# Altium PCB DC-DC_BUCK-BOOST.PcbDoc (part 3 of 3)
Units mm, origin at the board's own origin, x right, y up, seen from the top; angles counter-clockwise.
Board outline 250 x 400 mm, 4 copper layers (Top Layer 1, Top Layer, Bottom Layer, Bottom Layer 1), stack 0.603 mm thick; 332 components, 145 nets, 884 pads, 70 vias.
Unrouted connection lines stored in the file: 20.
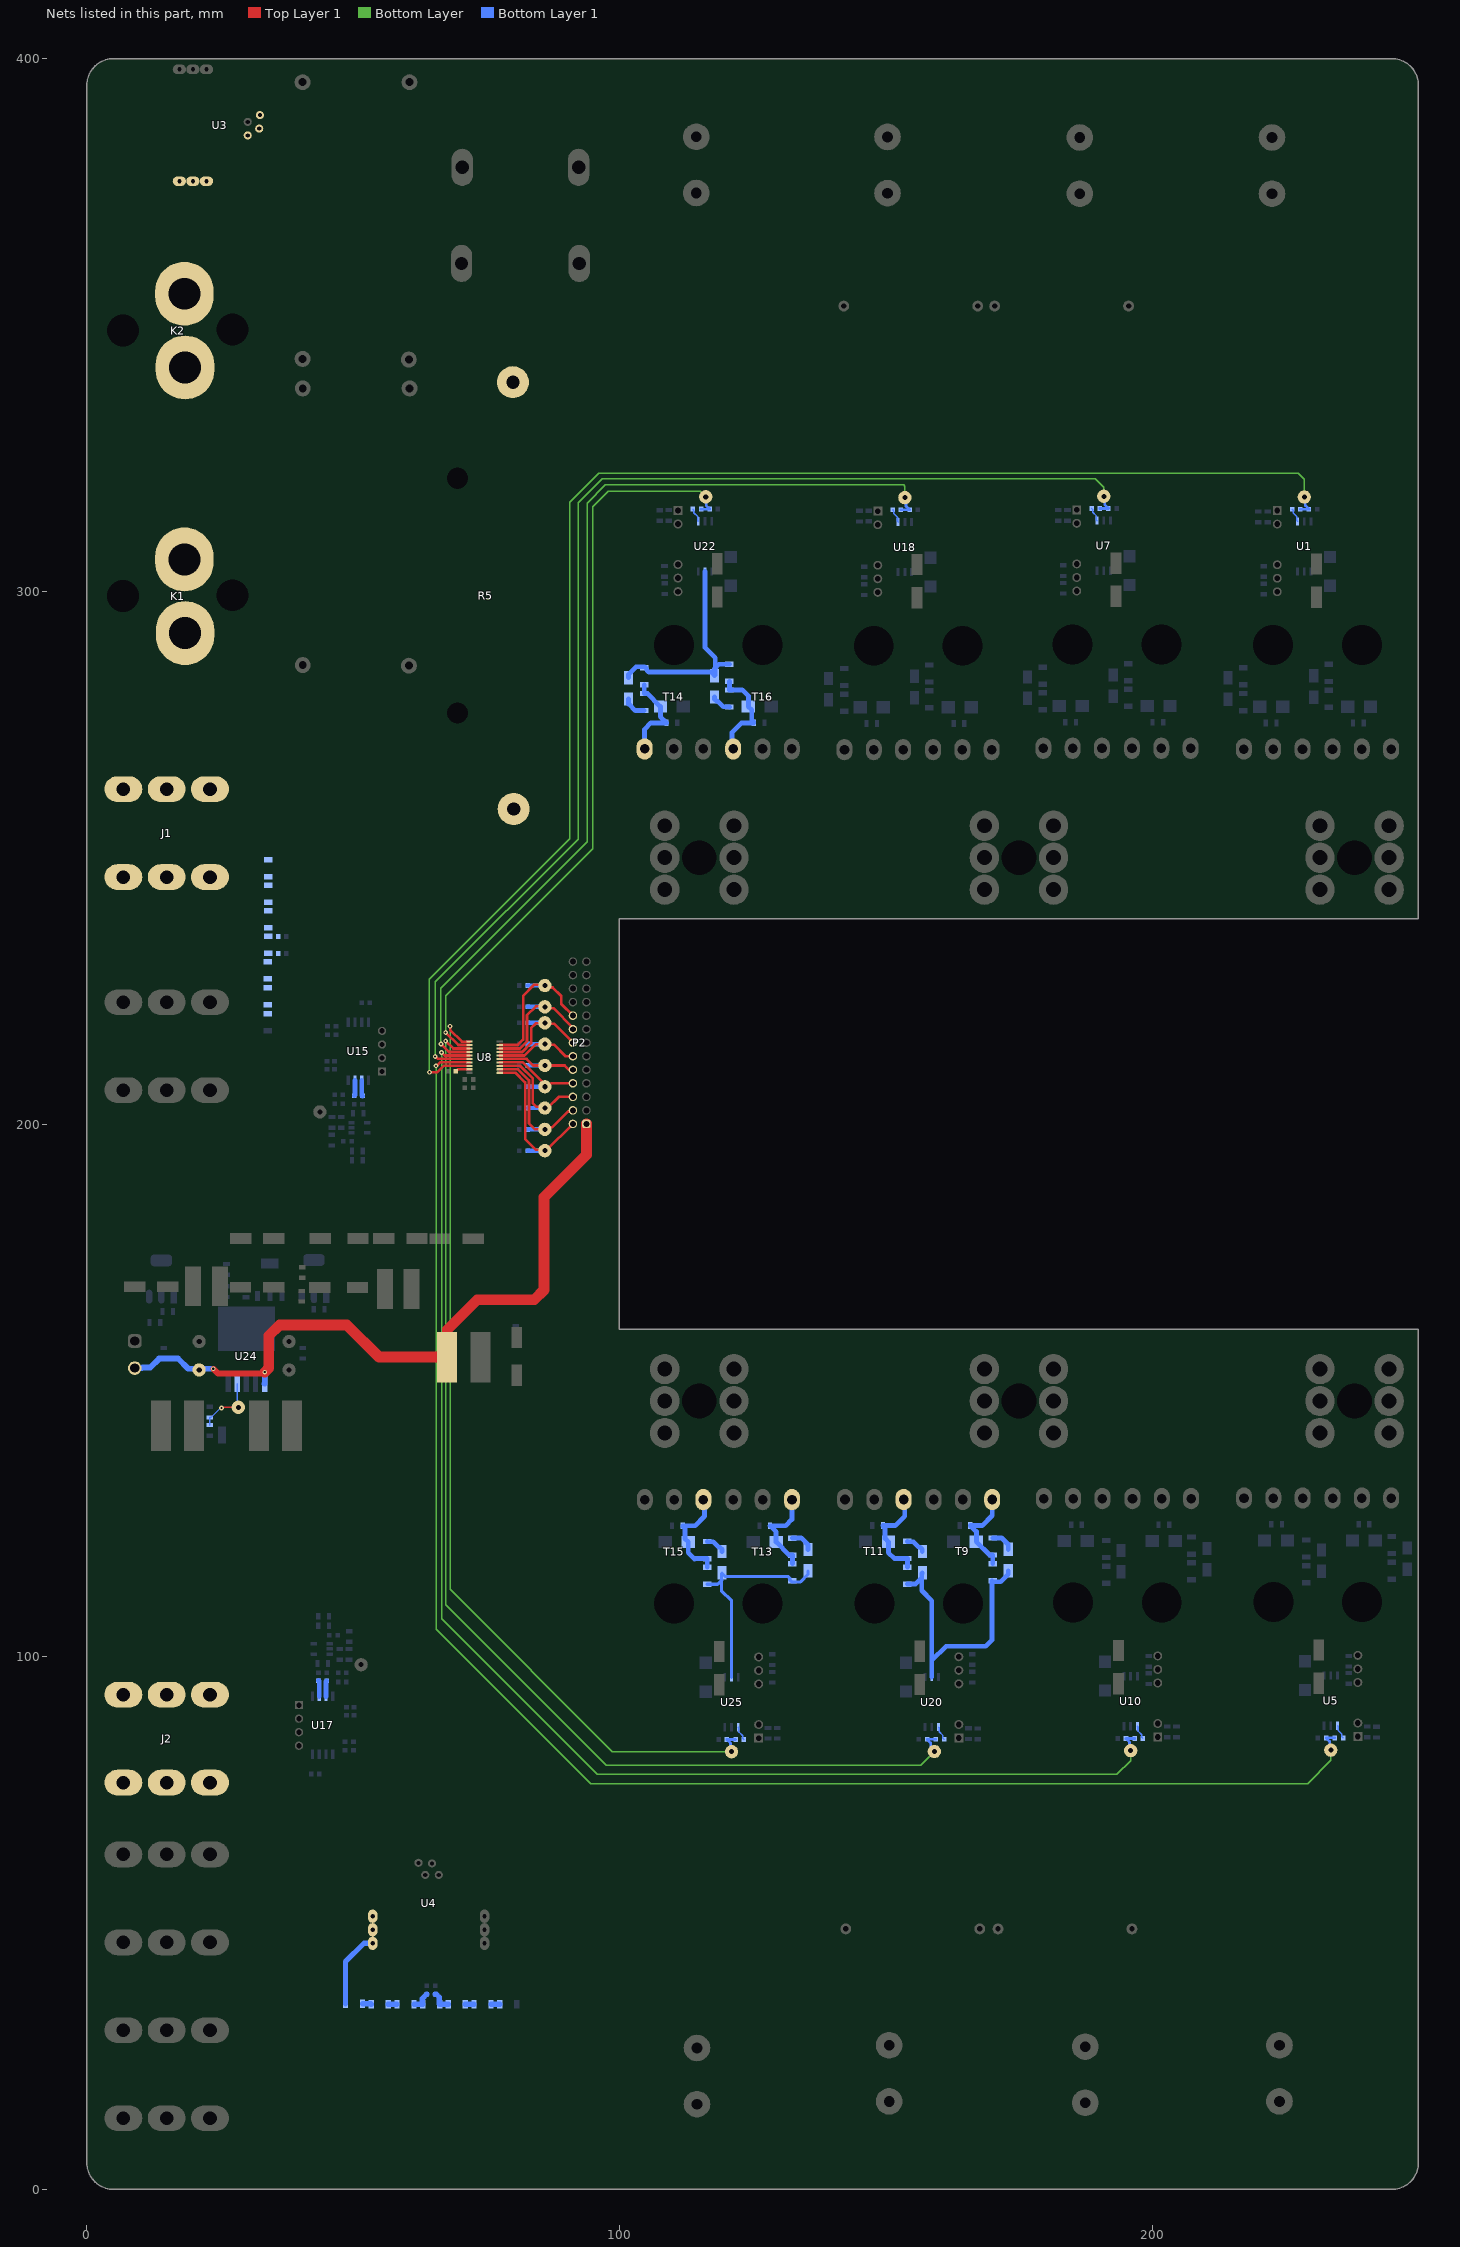
[diagram p4: the nets of this part, all layers, seen from the top]

## Via types
v1: diameter 0.9, hole 0.4, Top Layer 1 to Bottom Layer 1, tented both sides, 41 vias
v2: diameter 1.27, hole 0.711, Top Layer 1 to Bottom Layer 1, 21 vias
v3: diameter 0.7, hole 0.3, Top Layer 1 to Bottom Layer 1, 4 vias
v4: diameter 0.9, hole 0.4, Top Layer 1 to Bottom Layer 1, 2 vias
v5: diameter 0.8, hole 0.3, Top Layer 1 to Bottom Layer 1, 2 vias

## Nets (pads, with @x,y where several pads share a name; then routed paths per layer and width w, separated by ;. In a path a pad name is that pad's centre, name@x,y a point inside that pad or via, vN(x,y) a via of type N, cw(c..) or ccw(c..) an arc to the next point about the centre after c; other vN are vias at no path point) (continued)
NetD22_1: D22.1 D24.1 R86.2 R90.2 U20.5 | length 51.4
  Bottom Layer 1 w0.9: R86.2@154.066,113.622 155.556,113.622 156.733,114.799 D22.1@156.733,115.635 ; 156.733,114.398 156.733,112.428 158.638,110.523 158.638,99.303 ; D22.1@156.86,115.645 D22.1@156.86,115.762 ; U20.5@158.638,96.172 158.638,99.303 ; R90.2@169.953,114.079 171.592,114.079 172.989,115.476 D24.1@172.989,116.143 ; R90.2@169.953,114.219 169.953,103.153 168.775,101.975 161.31,101.975 158.638,99.303
NetD22_2: D22.2 R85.2 | length 3.8
  Bottom Layer 1 w0.9: R85.2@154.066,121.648 154.116,121.598 155.183,121.598 156.219,120.562 156.46,120.562 156.86,120.162 D22.2@156.86,119.762
NetD23_2: D23.2 R85.1 R86.1 R87.1 T11.1 | length 19.2
  Bottom Layer 1 w0.9: T11.1@153.343,129.515 153.558,129.3 153.558,126.398 151.78,124.62 149.875,124.62 R87.1@149.478,124.62 149.528,124.57 149.528,124.445 149.875,124.098 149.875,122.198 D23.2@150.501,121.572 150.501,119.549 151.653,118.397 151.704,118.448 R85.1@154.066,118.448 R86.1@154.066,116.822
NetD24_2: D24.2 R88.2 | length 4.4
  Bottom Layer 1 w0.9: R88.2@170.063,122.295 171.68,122.295 171.719,122.334 172.989,121.064 D24.2@172.989,120.143
NetD25_2: D25.2 R88.1 R90.1 R91.1 T9.1 | length 17.1
  Bottom Layer 1 w0.9: T9.1@169.98,129.515 169.98,126.505 168.095,124.62 R91.1@165.861,124.62 167.002,123.479 D25.2@167.002,121.572 169.479,119.095 R88.1@170.063,119.095 R90.1@170.063,117.469
NetD26_1: D26.1 D28.1 R93.2 R97.2 U22.5 | length 41.7
  Bottom Layer 1 w0.9: D28.1@101.712,283.792 101.712,284.459 103.109,285.856 104.748,285.856 105.138,285.466 105.138,285.191 105.49,284.84 117.291,284.84 117.841,284.29 D26.1@117.841,284.173 ; U22.5@116.063,303.763 116.063,289.412 117.968,287.507 117.968,285.475 D26.1@117.968,284.3 ; 117.841,285.475 118.679,286.313 R93.2@120.635,286.313
NetD26_2: D26.2 R92.2 | length 3.8
  Bottom Layer 1 w0.9: D26.2@117.841,280.173 117.841,279.773 118.241,279.373 118.482,279.373 119.518,278.337 120.585,278.337 R92.2@120.635,278.287
NetD27_2: D27.2 R92.1 R93.1 R94.1 T16.1 | length 19.2
  Bottom Layer 1 w0.9: R93.1@120.635,283.113 R92.1@120.635,281.487 122.997,281.487 123.048,281.538 124.2,280.386 D27.2@124.2,278.363 124.826,277.737 124.826,275.837 125.173,275.49 125.173,275.365 R94.1@125.223,275.315 124.826,275.315 122.921,275.315 121.143,273.537 121.143,270.635 T16.1@121.358,270.42
NetD28_2: D28.2 R95.2 | length 4.4
  Bottom Layer 1 w0.9: D28.2@101.712,279.792 101.712,278.871 102.982,277.601 103.021,277.64 R95.2@104.638,277.64
NetD29_2: D29.2 R95.1 R97.1 R98.1 T14.1 | length 17.6
  Bottom Layer 1 w0.9: R97.1@104.638,282.466 R95.1@104.638,280.84 105.222,280.84 D29.2@107.699,278.363 107.699,276.456 R98.1@108.84,275.315 105.903,275.315 104.721,274.133 104.721,270.674 T14.1@104.721,270.42
NetD30_1: D30.1 D32.1 R100.2 R104.2 U25.5 | length 41.7
  Bottom Layer 1 w0.6: R100.2@116.474,113.593 118.43,113.593 119.268,114.431 ; D30.1@119.141,115.606 119.141,114.431 119.141,112.399 121.046,110.494 U25.5@121.046,96.143 ; D30.1@119.268,115.733 119.268,115.616 119.818,115.066 131.619,115.066 131.971,114.715 131.971,114.44 132.361,114.05 134,114.05 135.397,115.447 D32.1@135.397,116.114
NetD30_2: D30.2 R99.2 | length 3.8
  Bottom Layer 1 w0.9: R99.2@116.474,121.619 116.524,121.569 117.591,121.569 118.627,120.533 118.868,120.533 119.268,120.133 D30.2@119.268,119.733
NetD31_2: D31.2 R99.1 R100.1 R101.1 T15.1 | length 19.2
  Bottom Layer 1 w0.9: T15.1@115.751,129.486 115.966,129.271 115.966,126.369 114.188,124.591 112.283,124.591 R101.1@111.886,124.591 111.936,124.541 111.936,124.416 112.283,124.069 112.283,122.169 D31.2@112.909,121.543 112.909,119.52 114.061,118.368 114.112,118.419 R99.1@116.474,118.419 R100.1@116.474,116.793
NetD32_2: D32.2 R102.2 | length 4.4
  Bottom Layer 1 w0.9: R102.2@132.471,122.266 134.088,122.266 134.127,122.305 135.397,121.035 D32.2@135.397,120.114
NetD33_2: D33.2 R102.1 R104.1 R105.1 T13.1 | length 17.6
  Bottom Layer 1 w0.9: T13.1@132.388,129.486 132.388,129.232 132.388,125.773 131.206,124.591 R105.1@128.269,124.591 129.41,123.45 D33.2@129.41,121.543 131.887,119.066 R102.1@132.471,119.066 R104.1@132.471,117.44
NetJ1_1: J1.1 K1.2 R5.1 R32.2
NetJ2_1: J2.1 R33.2 U4.5 U4.6 U4.7 | length 14.5
  Bottom Layer 1 w1: R33.2@48.575,34.825 48.575,42.745 52.04,46.21 53.66,46.21 U4.7@53.675,46.195
NetK1_1: K1.1 K2.2 R5.2
NetK2_1: K2.1 U3.8 U3.9 U3.10
NetP2_2: P2.2 R23.2 TP2.1 U8.1 | length 31.3
  Top Layer 1 w0.5: U8.1@77.55,209.625 80.5,209.625 82.3,207.825 82.3,197.175 84.323,195.152 86.083,195.152 86.235,195 P2.2@91.26,200.025
  Bottom Layer 1 w0.8: R23.2@82.775,195 TP2.1@86,195
NetP2_4: P2.4 R31.2 TP10.1 U8.2 | length 27.8
  Top Layer 1 w0.5: U8.2@77.55,210.275 80.95,210.275 83.025,208.2 83.025,200.125 84.15,199 TP10.1@86,199 86.383,199.383 87.358,199.383 90.33,202.355 91.05,202.355 P2.4@91.26,202.565
  Bottom Layer 1 w0.8: R31.2@82.775,199 TP10.1@86,199
NetP2_6: P2.6 R30.2 TP9.1 U8.3 | length 23.8
  Top Layer 1 w0.5: U8.3@77.55,210.925 81.375,210.925 83.75,208.55 83.75,203.875 84.398,203.227 85.773,203.227 TP9.1@86,203 86.5,203 88.605,205.105 P2.6@91.26,205.105
  Bottom Layer 1 w0.8: R30.2@82.775,203 TP9.1@86,203
NetP2_8: P2.8 R29.2 TP8.1 U8.4 | length 19.3
  Top Layer 1 w0.5: U8.4@77.55,211.575 81.85,211.575 86,207.425 TP8.1@86,207 86.541,207 87.186,207.645 P2.8@91.26,207.645
  Bottom Layer 1 w0.8: R29.2@82.775,207 TP8.1@86,207
NetP2_10: P2.10 R28.2 TP7.1 U8.5 | length 17.8
  Top Layer 1 w0.5: U8.5@77.55,212.225 82.55,212.225 83.775,211 TP7.1@86,211 89.7,211 90.515,210.185 P2.10@91.26,210.185
  Bottom Layer 1 w0.8: R28.2@82.775,211 TP7.1@86,211
NetP2_12: P2.12 R27.2 TP6.1 U8.6 | length 18.8
  Top Layer 1 w0.5: U8.6@77.55,212.875 82.175,212.875 84.293,214.993 85.993,214.993 TP6.1@86,215 86.108,214.892 87.707,214.892 89.875,212.725 P2.12@91.26,212.725
  Bottom Layer 1 w0.8: R27.2@82.775,215 TP6.1@86,215
NetP2_14: P2.14 R26.2 TP5.1 U8.7 | length 22.4
  Top Layer 1 w0.5: U8.7@77.55,213.525 81.75,213.525 83.425,215.2 83.425,218.05 84.293,218.918 85.918,218.918 TP5.1@86,219 86.152,218.848 87.677,218.848 P2.14@91.26,215.265
  Bottom Layer 1 w0.8: R26.2@82.775,219 TP5.1@86,219
NetP2_16: P2.16 R25.2 TP4.1 U8.8 | length 25
  Top Layer 1 w0.5: U8.8@77.55,214.175 81.3,214.175 82.65,215.525 82.65,220.45 84.293,222.093 85.907,222.093 86.252,221.748 87.577,221.748 91.26,218.065 P2.16@91.26,217.805
  Bottom Layer 1 w0.8: R25.2@82.775,222 TP4.1@86,222
NetP2_18: P2.18 R24.2 TP3.1 U8.9 | length 29.7
  Top Layer 1 w0.5: U8.9@77.55,214.825 80.9,214.825 81.925,215.85 81.925,224.075 84,226.15 85.85,226.15 86.364,225.636 87.464,225.636 89.075,224.025 89.075,222.53 P2.18@91.26,220.345
  Bottom Layer 1 w0.8: R24.2@82.775,226 TP3.1@86,226
NetR2_1: R2.1 R21.2 TP18.1 U8.18 | length 274.2
  Top Layer 1 w0.5: v1(64.325,209.725) 65.8,209.725 67,210.925 U8.18@71.85,210.925
  Bottom Layer w0.254: v1(64.325,209.725) 64.3,209.75 64.3,227.175 90.7,253.575 90.7,316.75 96.15,322.2 227.45,322.2 228.569,321.081 TP18.1@228.569,317.709
  Bottom Layer 1 w0.5: R2.1@227.82,315.423 R21.2@229.445,315.423 229.445,315.448 229.27,315.623 229.245,315.623 228.778,316.09 228.778,317.5 TP18.1@228.569,317.709
NetR2_2: R2.2 U1.1 | length 2.7
  Bottom Layer 1 w0.3: R2.2@226.27,315.423 226.478,315.215 226.478,314.72 227.182,314.016 227.182,313.254 U1.1@227.299,313.137
NetR10_1: R10.1 R20.2 TP17.1 U8.17 | length 300.3
  Top Layer 1 w0.5: v1(65.575,210.925) 65.683,210.925 66.333,211.575 U8.17@71.85,211.575
  Bottom Layer w0.254: v1(65.575,210.925) 65.575,105.175 94.575,76.175 229.2,76.175 233.543,80.518 TP17.1@233.543,82.467
  Bottom Layer 1 w0.5: TP17.1@233.543,82.467 233.334,82.676 233.334,84.086 232.867,84.553 232.842,84.553 232.667,84.728 R20.2@232.667,84.753 R10.1@234.292,84.753
NetR10_2: R10.2 U5.1 | length 2.7
  Bottom Layer 1 w0.3: U5.1@234.813,87.039 234.93,86.922 234.93,86.16 235.634,85.456 235.634,84.961 R10.2@235.842,84.753
NetR14_2: R14.2 R103.1 TP11.1 U8.11 | length 180.7
  Top Layer 1 w0.5: v1(68.2,218.35) 68.224,218.326 68.224,217.676 70.425,215.475 U8.11@71.85,215.475
  Bottom Layer w0.254: v1(68.2,218.35) 68.2,112.65 98.677,82.173 TP11.1@121.046,82.173
  Bottom Layer 1 w0.5: TP11.1@121.046,82.173 120.837,82.382 120.837,83.792 120.37,84.259 120.345,84.259 120.17,84.434 R14.2@120.17,84.459 R103.1@121.795,84.459
NetR15_2: R15.2 R96.1 TP12.1 U8.12 | length 142.7
  Top Layer 1 w0.5: v1(67.375,217.2) 69.75,214.825 U8.12@71.85,214.825
  Bottom Layer w0.254: v1(67.375,217.2) 67.375,224.05 94.975,251.65 94.975,315.925 97.85,318.8 115.154,318.8 115.77,318.184 115.77,318.18 TP12.1@116.2,317.75
  Bottom Layer 1 w0.5: R96.1@115.314,315.447 116.739,315.447 R15.2@116.939,315.447 116.939,315.472 116.764,315.647 116.739,315.647 116.272,316.114 116.272,317.678 TP12.1@116.2,317.75
NetR16_2: R16.2 R89.1 TP13.1 U8.13 | length 220.5
  Top Layer 1 w0.5: v1(67.375,215.6) 68.8,214.175 U8.13@71.85,214.175
  Bottom Layer w0.254: v1(67.375,215.6) 67.375,109.75 97.5,79.625 156.536,79.625 TP13.1@159.113,82.202
  Bottom Layer 1 w0.5: TP13.1@158.638,82.202 158.429,82.411 158.429,83.821 157.962,84.288 157.937,84.288 157.762,84.463 R16.2@157.762,84.488 R89.1@159.387,84.488
NetR17_2: R17.2 R79.1 TP14.1 U8.14 | length 186.5
  Top Layer 1 w0.5: v1(66.5,215) 67.975,213.525 U8.14@71.85,213.525
  Bottom Layer w0.254: v1(66.5,215) 66.45,215.05 66.45,225.475 93.925,252.95 93.925,316.575 97.325,319.975 153.325,319.975 153.584,319.716 TP14.1@153.584,317.599
  Bottom Layer 1 w0.5: R79.1@152.835,315.313 R17.2@154.46,315.313 154.46,315.338 154.285,315.513 154.26,315.513 153.793,315.98 153.793,317.39 TP14.1@153.584,317.599
NetR18_2: R18.2 R70.1 TP15.1 U8.15 | length 260.6
  Top Layer 1 w0.5: v1(66.6,213.45) 67.175,212.875 U8.15@71.85,212.875
  Bottom Layer w0.254: v1(66.6,213.45) 66.6,107.1 95.8,77.9 193.4,77.9 195.969,80.469 TP15.1@195.969,82.367
  Bottom Layer 1 w0.5: TP15.1@195.969,82.367 195.76,82.576 195.76,83.986 195.293,84.453 195.268,84.453 195.093,84.628 R18.2@195.093,84.653 R70.1@196.718,84.653
NetR19_2: R19.2 R39.1 TP16.1 U8.16 | length 228.9
  Top Layer 1 w0.5: v1(65.4,212.675) 65.508,212.675 65.958,212.225 U8.16@71.85,212.225
  Bottom Layer w0.254: v1(65.4,212.675) 65.4,226.675 92.225,253.5 92.225,316.625 96.775,321.175 189.3,321.175 190.927,319.548 TP16.1@190.927,317.851
  Bottom Layer 1 w0.5: R39.1@190.178,315.565 R19.2@191.803,315.565 191.803,315.59 191.628,315.765 191.603,315.765 191.136,316.232 191.136,317.642 TP16.1@190.927,317.851
NetR22_2: R22.2 U8.19 | length 2.7
  Top Layer 1 w0.5: R22.2@69.275,209.925 69.287,209.913 69.65,210.275 U8.19@71.85,210.275
NetR32_1: R32.1 R37.2
NetR33_1: R33.1 R38.2 | length 1.6
  Bottom Layer 1 w1: R33.1@51.775,34.825 53.35,34.825 R38.2@53.4,34.775
NetR37_1: R37.1 R40.2
NetR38_1: R38.1 R41.2 | length 1.6
  Bottom Layer 1 w1: R38.1@56.6,34.775 58.175,34.775 R41.2@58.225,34.725
NetR39_2: R39.2 U7.1 | length 2.7
  Bottom Layer 1 w0.3: R39.2@188.628,315.565 188.836,315.357 188.836,314.862 189.54,314.158 189.54,313.396 U7.1@189.657,313.279
NetR40_1: R40.1 R46.2 R48.2
NetR41_1: R41.1 R47.2 R49.2 | length 3.9
  Bottom Layer 1 w1: R41.1@61.425,34.725 R49.2@63.05,34.725 63,34.775 63,35.825 R47.2@63.825,36.65
NetR42_2: R42.2 U15.7 | length 3
  Bottom Layer 1 w0.9: R42.2@50.21,205.301 50.34,205.431 U15.7@50.34,208.225
NetR43_2: R43.2 U17.7 | length 3
  Bottom Layer 1 w0.9: U17.7@44.92,92.551 44.92,95.345 R43.2@45.05,95.475
NetR48_1: R48.1 R54.2 R56.2
NetR49_1: R49.1 R55.2 R57.2 | length 4
  Bottom Layer 1 w1: R55.2@65.4,36.65 65.425,36.625 65.625,36.625 66.175,36.075 66.175,34.8 R49.1@66.25,34.725 R57.2@67.85,34.725
NetR50_2: R50.2 U15.6 | length 3.2
  Bottom Layer 1 w0.9: U15.6@51.61,208.225 51.61,205.326 51.735,205.201 51.735,205.251 R50.2@51.785,205.301
NetR51_2: R51.2 U17.6 | length 3.2
  Bottom Layer 1 w0.9: R51.2@43.475,95.475 43.525,95.525 43.525,95.575 43.65,95.45 U17.6@43.65,92.551
NetR56_1: R56.1 R60.2
NetR57_1: R57.1 R61.2 | length 1.7
  Bottom Layer 1 w1: R57.1@71.05,34.725 72.675,34.725 R61.2@72.7,34.75
NetR60_1: R60.1 R62.2
NetR61_1: R61.1 R63.2 | length 1.6
  Bottom Layer 1 w1: R61.1@75.9,34.75 R63.2@77.525,34.75
NetR70_2: R70.2 U10.1 | length 2.7
  Bottom Layer 1 w0.3: U10.1@197.239,86.939 197.356,86.822 197.356,86.06 198.06,85.356 198.06,84.861 R70.2@198.268,84.653
NetR76_1: R76.1 R77.2 TP21.1 U24.4 | length 12.1
  Top Layer 1 w0.3: v1(25.273,146.689) 25.4,146.816 TP21.1@28.448,146.816
  Bottom Layer 1 w0.3: R77.2@23.114,143.498 R76.1@23.114,144.927 23.339,144.927 25.101,146.689 v1(25.273,146.689) ; U24.4@28.27,151.253 28.27,146.994 TP21.1@28.448,146.816
NetR79_2: R79.2 U18.1 | length 2.7
  Bottom Layer 1 w0.3: R79.2@151.285,315.313 151.493,315.105 151.493,314.61 152.197,313.906 152.197,313.144 U18.1@152.314,313.027
NetR89_2: R89.2 U20.1 | length 2.7
  Bottom Layer 1 w0.3: U20.1@159.908,86.774 160.025,86.657 160.025,85.895 160.729,85.191 160.729,84.696 R89.2@160.937,84.488
NetR96_2: R96.2 U22.1 | length 2.7
  Bottom Layer 1 w0.3: R96.2@113.764,315.447 113.972,315.239 113.972,314.744 114.676,314.04 114.676,313.278 U22.1@114.793,313.161
NetR103_2: R103.2 U25.1 | length 2.7
  Bottom Layer 1 w0.3: U25.1@122.316,86.745 122.433,86.628 122.433,85.866 123.137,85.162 123.137,84.667 R103.2@123.345,84.459
NetU3_1: U3.1
NetU3_2: U3.2
NetU3_4: U3.4
VCC: C74.1 C77.2 L1.1 P1.2 P2.1 U24.1 | length 132
  Top Layer 1 w1.1: v1(23.749,154.055) 24.604,153.2 33.181,153.2 v1(33.401,153.42)
  Top Layer 1 w2: v1(33.401,153.42) 34.175,154.194 34.175,160.25 36.2,162.275 48.825,162.275 54.85,156.25 L1.1@67.65,156.25 67.65,161.4 73.275,167.025 84,167.025 85.825,168.85 85.825,186.25 93.8,194.225 P2.1@93.8,200.025
  Bottom Layer 1 w1.1: 10.375,154.182 10.488,154.295 11.924,154.295 13.579,155.95 14.451,155.95 C77.2@14.478,155.976 17.129,155.976 19.05,154.055 v1(23.749,154.055) ; U24.1@33.376,151.253 33.401,151.278 v1(33.401,153.42)
pads on no net: J6.0 J7.0 J8.0 J9.0 J11.0 J12.0 K1.0 K2.0 P2.3 P2.5 P2.7 P2.9 P2.11 P2.21 P2.22 P2.23 P2.24 P2.25 P2.26 R5.0 T1.0 T2.0 T3.0 T4.0 T5.0 T6.0 T7.0 T8.0 T9.0 T10.0 T11.0 T12.0 T13.0 T14.0 T15.0 T16.0 U1.2 U4.1 U4.2 U4.3 U4.4 U5.2 U7.2 U10.2 U18.2 U20.2 U22.2 U25.2

## Polygon pours and split planes (outlines as drawn)
NetC92_1 on Top Layer 1 "NETC92_1_L01_P045" (solid, pour order 45): 37.525,281.5 37.525,293.85 37.55,293.875 37.525,293.9 37.525,363.675 41.625,367.775 73.5,367.775 78.675,362.6 78.675,351.1 64.6,337.025 64.6,280.85 64.625,280.825
NetC92_1 on Top Layer 1 "NETC92_1_L01_P044" (solid, pour order 44): 5.1,200.95 0.675,205.375 0.375,205.375 0.375,227.075 4.225,230.925 28.3,230.925 41.6,244.225 41.6,271.05 37.525,275.125 37.525,291.275 40.25,294 61.225,294 64.625,290.6 64.625,280.825 53.6,269.8 53.6,235.925 29.675,212 29.675,204.925 25.75,201 23.95,201 5.2,201
NetJ1_1 on Top Layer 1 "NETJ1_1_L01_P042" (solid, pour order 42): 4.464,242.686 1.4,245.75 1.4,263.975 5.425,268 8.45,268 11.5,271.05 11.5,294.975 14.775,298.25 21.75,298.25 24.5,295.5 24.5,269.325 25.9,267.925 27.075,267.925 29.75,265.25 29.75,246.75 25.664,242.664
NetK1_1 on Top Layer 1 "NETK1_1_L01_P040" (solid, pour order 40): 26.405,302.755 23.325,299.675 13.8,299.675 10.35,303.125 10.35,344.813 13.825,348.288 22.8,348.288 26.495,344.593
NetK2_1 on Top Layer 1 "NETK2_1_L01_P039" (solid, pour order 39): 10.395,374.658 14.925,379.188 24,379.188 27.725,375.463 27.725,353.738 23.075,349.088 14.1,349.088 10.349,352.839
NetC17_2 on Top Layer 1 "NETC17_2_L01_P038" (solid, pour order 38): 12,397.7 14.05,399.75 74.65,399.75 78.75,395.65 78.75,376.4 72.7,370.35 72.5,370.55 61.075,370.55 39.325,392.3 14.1,392.3 12,394.4 12,395.1
GND on Top Layer 1 "GND_L01_P036" (solid, pour order 36): 0.725,179.021 5.429,183.725 78.154,183.725 87.254,174.625 87.254,139.25 78.454,130.45 5.115,130.45 0.725,134.725
NetC1_2 on Top Layer 1 "NETC1_2_L01_P028" (solid, pour order 28): 4.6,40.7 1.95,43.35 1.95,64.175 4.675,66.9 28.175,66.9 31.05,64.025 31.05,59.65 53.875,36.825 115.825,36.825 123.575,29.075 123.4,28.9 123.4,24 121.15,21.75 44.375,21.75 32.6,33.525 25.325,40.8 4.875,40.8
NetC1_2 on Top Layer 1 "NETC1_2_L01_P024" (solid, pour order 24): 101.925,131.235 102.923,132.05 106.35,132.05 107.075,131.325 107.05,131.3 107.05,126.9 108.55,125.4 118.8,125.4 118.8,132.05 123.8,132.05 123.8,121.05 119.925,117.175 119.925,108.425 117.65,106.15 115.275,106.15 110.175,101.05 110.175,61.475 116.475,55.175 116.6,55.3 142,55.3 155.775,41.525 155.775,25.45 152.175,21.85 111.3,21.85 101.925,31.225
NetC1_1 on Top Layer 1 "NETC1_1_L01_P023" (solid, pour order 23): 162.25,132.325 162.975,133.05 162.975,133.075 165.625,133.075 166.9,131.8 166.9,127.125 169,125.025 174.85,125.025 177.05,127.225 177.05,131.15 178.9,133 181,133 182.05,131.95 182.05,126.55 183.475,125.125 193.7,125.125 195.95,122.875 195.95,110.2 191.6,105.85 189.425,105.85 182.45,98.875 182.45,54.825 171.15,43.525 167.175,43.525 160.6,50.1 160.6,73.25 163.85,76.5 168.625,76.5 172.6,80.475 172.6,117.975 170.275,120.3 165.4,120.3 161.35,124.35 161.35,127.475 162.225,128.35
NetC7_1 on Top Layer 1 "NETC7_1_L01_P022" (solid, pour order 22): 219.05,125.85 220.475,127.275 220.475,132.1 221.1,132.725 224.275,132.725 225.175,131.825 225.175,127.275 225.275,127.275 226.65,125.9 226.675,125.925 235.95,125.925 237.175,127.15 237.175,131.525 238.375,132.725 240.6,132.725 241.8,131.525 241.8,127.025 243,125.825 243.65,125.825 244.45,125.025 244.45,121.525 243.575,120.65 235.75,120.65 227.075,111.975 227.075,41.725 229.05,39.75 229.05,24.5 227.2,22.65 184.725,22.65 180.4,26.975 180.4,38.175 194.825,52.6 204.525,52.6 214.25,62.325 214.25,124.525 215.575,125.85
NetC66_1 on Top Layer 1 "NETC66_1_L01_P015" (solid, pour order 15): 134.825,160.491 134.825,136.075 131.75,133 129.7,133 129.2,132.5 129.2,127.8 128.3,126.9 125.65,126.9 124.625,127.925 124.625,132.375 123.025,133.975 114.15,133.975 112.625,132.45 112.625,127.9 111.65,126.925 109.05,126.925 107.95,128.025 107.95,133.975 103.7,133.975 100.925,136.75 100.925,160.625
NetC1_1 on Top Layer 1 "NETC1_1_L01_P018" (solid, pour order 18): 137.8,158.75 139.375,160.325 207.675,160.325 210.95,157.05 210.95,135.225 209.525,133.8 199.85,133.8 198.65,132.6 198.65,128 197.825,127.175 194.925,127.175 193.95,128.15 193.95,132.725 192.875,133.8 183.175,133.8 181.975,132.6 181.975,127.775 181.075,126.875 178.3,126.875 177.075,128.1 177.075,132.675 176.1,133.65 168.025,133.65 166.775,132.4 166.775,127.5 165.975,126.7 163.325,126.7 162.225,127.8 162.225,132.55 160.425,134.35 152.075,134.35 150.225,132.5 150.225,127.2 149.325,126.3 146.725,126.3 145.625,127.4 145.625,133.3 144.175,134.75 138.95,134.75 137.8,135.9
NetC20_1 on Top Layer 1 "NETC20_1_L01_P016" (solid, pour order 16): 247.25,160.6 249.075,158.775 249.075,135.45 248.15,134.525 237.975,134.525 236.525,133.075 236.525,128.175 235.6,127.25 232.45,127.25 231.525,128.175 231.525,133.175 229.8,134.9 221.75,134.9 219.825,132.975 219.825,128.225 218.5,126.9 215.9,126.9 214.325,128.475 214.325,158.423 216.665,160.6
NetC5_2 on Top Layer 1 "NETC5_2_L01_P014" (solid, pour order 14): 162.05,267.3 162.05,273.575 156.25,279.375 156.25,290.425 163.525,297.7 163.525,354.15 165.225,355.85 172.375,355.85 175.95,352.275 175.95,297.55 175.95,280.825 177.975,278.8 189.7,278.8 193.15,275.35 193.15,266.675 192.45,265.975 188.6,265.975 187.65,266.925 187.65,273.75 186.875,274.525 167.9,274.525 166.625,273.25 166.625,266.725 165.975,266.075 162.225,266.075 162.225,266.95 161.6,267.575 162.075,268.05 162.075,274.05
NetC5_2 on Top Layer 1 "NETC5_2_L01_P001" (solid, pour order 1): 139.151,239.424 138.9,239.675 138.9,264.575 140.575,266.25 144.675,266.25 145.45,267.025 145.45,272.125 146.25,272.925 149.025,272.925 149.975,271.975 149.975,267.4 151.075,266.3 161.05,266.3 162.05,267.3 162.05,272.4 162.675,273.025 165.85,273.025 166.625,272.25 166.625,267.425 167.9,266.15 186.8,266.15 188.275,267.625 188.275,272.225 189.525,273.475 191.875,273.475 193.05,272.3 193.05,266.775 193.95,265.875 203.25,265.875 204.925,267.55 204.925,272.45 205.85,273.375 209.575,273.375 210.6,272.35 210.6,240.275 209.45,239.125
NetC2_1 on Top Layer 1 "NETC2_1_L01_P002" (solid, pour order 2): 214.7,239.425 213.3,240.825 213.3,265.05 214.225,265.975 224.4,265.975 225.85,267.425 225.85,272.325 226.775,273.25 229.925,273.25 230.85,272.325 230.85,267.325 232.575,265.6 240.625,265.6 242.55,267.525 242.55,272.275 243.875,273.6 247.775,273.6 249.15,272.225 249.15,240.1 248.15,239.1
NetC5_1 on Top Layer 1 "NETC5_1_L01_P013" (solid, pour order 13): 89.25,375.05 89.25,375.1 84.775,379.575 84.775,387.95 94.25,397.425 238.65,397.425 245.85,390.225 249.575,386.5 249.575,376.975 247.625,375.025 240.5,367.9 179.725,367.9 174.075,373.55 174.075,380.825 171.2,383.7 107.575,383.7 98.95,375.075 98.575,375.075
NetC6_2 on Top Layer 1 "NETC6_2_L01_P011" (solid, pour order 11): 113.45,267.75 114.075,267.125 116.75,267.125 117.975,268.35 117.925,268.4 117.925,273.15 118.775,274 129.925,274 130.525,273.4 130.525,268.1 131.575,267.05 133.85,267.05 135.2,268.4 135.2,274.525 135.225,274.525 137.825,277.125 137.825,342.2 148.475,352.85 148.475,364.25 155.55,371.325 156.075,371.325 157.775,373.025 157.775,377.925 156.7,379 110.05,379 103.9,372.85 89.6,372.85 83.65,366.9 83.65,356.475 91.075,349.05 117.1,349.05 126.825,339.325 126.825,297.8 113.45,284.425 113.45,272.95
NetC5_1 on Top Layer 1 "NETC5_1_L01_P005" (solid, pour order 5): 219.531,274.375 220.175,274.375 220.575,273.975 220.575,268.05 221.6,267.025 223.825,267.025 224.9,268.1 224.9,273.875 226.125,275.1 236.725,275.1 237.35,274.475 237.35,267.875 238.25,266.975 240.525,266.975 241.55,268 241.55,274.275 243.85,276.575 249.025,276.575 249.575,277.125 249.575,378.05 246.75,380.875 180.775,380.875 177.375,377.475 177.375,363.8 183.9,357.275 186.475,357.275 194,349.75 194,346.25 200.2,340.05 236.975,340.05 239.475,337.55 239.475,283.55 237.3,281.375 220.5,281.375 218.3,279.175 218.3,275.316
NetC60_1 on Top Layer 1 "NETC60_1_L01_P000" (solid, pour order 0): 100.95,239.675 101.025,239.75 101.025,264.925 102.425,266.325 107.375,266.325 107.375,266.4 108.05,267.075 108.05,272.4 108.775,273.125 111.425,273.125 112.35,272.2 112.35,266.9 113.2,266.05 123.45,266.05 124.625,267.225 124.625,271.925 125.8,273.1 127.725,273.1 129.025,271.8 129.025,266.175 133.25,266.175 135.1,264.325 135.1,239.35
NetK1_1 on Bottom Layer 1 "NETK1_1_L04_P048" (solid, pour order 48): 74.597,344.7 82.275,344.7 86.375,340.6 86.375,335.175 76.375,325.175 68.375,325.175 42.9,299.7 13.55,299.7 9.75,303.5 9.75,309.9 16.225,316.375 47.201,316.375
NetC92_1 on Bottom Layer 1 "NETC92_1_L04_P047" (solid, pour order 47): 0.375,227.075 4.225,230.925 25.25,230.925 28.925,227.25 28.925,219.65 30.55,218.025 34.775,218.025 34.775,216.375 34.125,215.725 31.7,215.725 29.675,213.7 29.675,204.925 25.75,201 5.05,201 5.05,201.075 0.375,205.75
NetJ1_1 on Bottom Layer 1 "NETJ1_1_L04_P046" (solid, pour order 46): 4.425,242.7 1.4,245.725 1.4,263.975 5.425,268 82.9,268 86.425,264.475 86.425,255.6 80,249.175 31.8,249.175 31.775,249.2 29.7,247.125 29.7,246.675 25.7,242.675
GND on Bottom Layer 1 "GND_L04_P037" (solid, pour order 37): 57.885,211.926 56.135,213.676 43.135,213.676 41.11,211.651 41.11,192.976 43.46,190.626 55.16,190.626 57.885,193.351
NetC17_1 on Bottom Layer 1 "NETC17_1_L04_P043" (solid, pour order 43): 38.19,344.04 40.2,346.05 60.85,346.05 63.1,343.8 63.1,337.6 61.05,335.55 40.25,335.55 38.359,337.441
GND on Bottom Layer 1 "GND_L04_P034" (solid, pour order 34): 0.621,179.021 5.325,183.725 78.05,183.725 87.15,174.625 87.15,139.25 78.35,130.45 5.011,130.45 0.621,134.725
GND on Bottom Layer 1 "GND_L04_P037" (solid, pour order 37): 37.375,88.85 39.125,87.1 52.125,87.1 54.15,89.125 54.15,107.8 51.8,110.15 40.1,110.15 37.375,107.425
NetJ2_1 on Bottom Layer 1 "NETJ2_1_L04_P030" (solid, pour order 30): 1.35,94.125 4.475,97.25 28.275,97.25 31.95,93.575 31.95,81.675 56.275,57.35 56.275,45.825 54.825,44.375 52.175,44.375 50.1,46.45 50.1,49.9 27.675,72.325 3.575,72.325 1.35,74.55
NetC7_1 on Bottom Layer 1 "NETC7_1_L04_P029" (solid, pour order 29): 74.375,43.35 71.75,45.975 71.75,60.25 82.3,70.8 190.875,70.8 203.3,58.375 203.3,42.05 196.775,35.525 185.6,35.525 180.425,40.7 180.425,50.125 173.125,57.425 86.375,57.425 82.75,53.8 82.75,46.425 79.675,43.35
NetC1_1 on Bottom Layer 1 "NETC1_1_L04_P027" (solid, pour order 27): 33.55,22.225 29.575,26.2 29.575,31.475 26.9,34.15 3.95,34.15 3.95,34.125 1.025,31.2 1.025,11.85 4.05,8.825 110.05,8.825 110.05,22 109.825,22.225
NetC1_1 on Bottom Layer 1 "NETC1_1_L04_P026" (solid, pour order 26): 164.925,49.425 166.85,51.35 171.3,51.35 173.45,49.2 173.45,25.25 177.75,20.95 227.075,20.95 231.025,17 231.025,11.4 228.45,8.825 110.05,8.825 107.175,11.7 107.175,20.3 109.1,22.225 161.45,22.225 164.925,25.7
NetC20_1 on Bottom Layer 1 "NETC20_1_L04_P021" (solid, pour order 21): 235.625,127.2 236.225,127.8 236.225,132.625 237.3,133.7 247.475,133.7 249.325,135.55 249.325,159.15 247.8,160.675 189,160.675 186.475,158.15 186.475,139.15 182.4,135.075 182.4,128.575 183.825,127.15 186.475,127.15 187.625,128.3 187.625,132.575 188.75,133.7 198.6,133.7 199.6,132.7 199.6,127.85 200.625,126.825 203.025,126.825 204.175,127.975 204.175,132.825 205.05,133.7 213.425,133.7 214.275,132.85 214.275,128.475 215.9,126.85 215.975,126.925 218.65,126.925 219.6,127.875 219.6,132.725 220.575,133.7 230.025,133.7 231.15,132.575 231.15,128.325 232.248,127.227
NetC66_1 on Bottom Layer 1 "NETC66_1_L04_P019" (solid, pour order 19): 100.95,159.175 102.025,160.25 160.925,160.25 162.625,158.55 162.625,133.525 161.3,132.2 161.3,127.575 160.525,126.8 157.55,126.8 156.725,127.625 156.725,132.35 154.675,134.4 146.675,134.4 144.7,132.425 144.7,127.65 143.925,126.875 140.875,126.875 140.075,127.675 140.075,133.7 138.975,134.8 131.475,134.8 129.175,132.5 129.175,127.775 128.35,126.95 125.675,126.95 124.65,127.975 124.65,132.3 122.975,133.975 114.125,133.975 112.625,132.475 112.625,127.725 111.825,126.925 108.9,126.925 107.975,127.85 107.975,133.5 107.625,133.85 103.8,133.85 100.9,136.75 100.95,136.8
NetC5_2 on Bottom Layer 1 "NETC5_2_L04_P012" (solid, pour order 12): 108.425,380.525 108.425,392.85 110.581,395.006 227.294,395.006 230.5,391.8 230.5,382.075 227.5,379.075 180.95,379.075 176.3,374.425 176.3,353.275 173.05,350.025 164.825,350.025 160.075,354.775 160.075,376.25 155.8,380.525
NetC2_1 on Bottom Layer 1 "NETC2_1_L04_P006" (solid, pour order 6): 182.325,267.15 182.8,267.625 182.8,272.35 183.675,273.225 186.275,273.225 187.3,272.2 187.3,267.5 188.275,266.525 198.425,266.525 199.4,267.5 199.4,272.325 200.55,273.475 202.775,273.475 203.875,272.375 203.875,267.65 205.6,265.925 224.3,265.925 225.9,267.525 225.9,271.775 227.025,272.9 229.95,272.9 230.8,272.05 230.8,267.25 231.9,266.15 241.175,266.15 241.175,266.2 242.575,267.6 242.575,271.875 243.6,272.9 246.1,272.9 248.325,270.675 248.325,267.425 249.45,266.3 249.45,240.55 248.15,239.25 248.125,239.275 193.35,239.275 190.825,241.8 190.825,259.6 188.725,261.7 183.575,261.7 182.325,262.95
NetC60_1 on Bottom Layer 1 "NETC60_1_L04_P010" (solid, pour order 10): 103.05,239.2 101,241.25 101,264.9 100.975,264.925 102.375,266.325 106.15,266.325 107.9,268.075 107.925,268.075 107.925,272.275 108.8,273.15 111.4,273.15 112.425,272.125 112.425,267.425 113.4,266.45 123.55,266.45 124.525,267.425 124.525,272.25 125.675,273.4 127.9,273.4 129.075,272.225 129.075,267.5 130.725,265.85 149.425,265.85 151.025,267.45 151.025,271.7 152.15,272.825 155.075,272.825 155.925,271.975 155.925,267.175 157.025,266.075 166.275,266.075 167.475,267.275 167.475,271.575 169.05,273.15 171.875,273.15 173.15,271.875 173.15,264.15 170.825,261.825 163.1,261.825 160.425,259.15 160.425,242.325 157.3,239.2
GND on Bottom Layer "GND_L03_P049" (solid, pour order 49): 101.089,310.066 230.514,310.066 235.864,315.416 235.864,322.791 229.064,329.591 98.914,329.591 86.739,317.416 86.739,257.516 57.964,228.741 57.964,103.516 91.914,69.566 234.014,69.566 242.614,78.166 242.614,87.491 239.489,90.616 98.389,90.616 87.039,101.966 87.039,189.291 88.606,190.858 96.706,190.858 99.614,193.766 99.614,308.591
GND on Bottom Layer "GND_L03_P033" (solid, pour order 33): 0.55,179.35 4.8,183.6 78.35,183.6 87.1,174.85 87.1,139.45 79.5,131.85 3.175,131.85 0.55,134.475 0.55,175.175

## Silkscreen, mask and mechanical layers (free items; w line width, h text height)
Top Overlay:
  lines w0.254: 100,238.5 137.5,238.5 ; 100,238.5 100,295.5 ; 100,238.5 175,238.5 ; 100,238.5 100,295.5 ; 100,238.5 250,238.5 ; 100,238.5 100,295.5 ; 100,295.5 137.5,295.5 ; 100,295.5 175,295.5 ; 100,295.5 250,295.5 ; 100.025,104.575 250.025,104.575 ; 100.025,104.575 100.025,161.575 ; 100.025,104.575 137.525,104.575 ; 100.025,104.575 100.025,161.575 ; 100.025,161.575 250.025,161.575 ; 100.025,161.575 137.525,161.575 ; 137.5,238.5 137.5,295.5 ; 137.5,238.5 175,238.5 ; 137.5,238.5 137.5,295.5 ; 137.5,295.5 175,295.5 ; 137.525,104.575 137.525,161.575 ; 137.525,104.575 175.025,104.575 ; 137.525,104.575 137.525,161.575 ; 137.525,161.575 175.025,161.575 ; 175,238.5 175,295.5 ; 175,238.5 250,238.5 ; 175,238.5 175,295.5 ; 175,238.5 212.5,238.5 ; 175,238.5 175,295.5 ; 175,238.5 175,295.5 ; 175,295.5 250,295.5 ; 175,295.5 212.5,295.5 ; 175.025,104.575 175.025,161.575 ; 175.025,104.575 250.025,104.575 ; 175.025,104.575 175.025,161.575 ; 175.025,104.575 212.525,104.575 ; 175.025,104.575 175.025,161.575 ; 175.025,161.575 250.025,161.575 ; 175.025,161.575 212.525,161.575 ; 212.5,238.5 250,238.5 ; 212.5,238.5 212.5,295.5 ; 212.5,238.5 212.5,295.5 ; 212.5,295.5 250,295.5 ; 212.525,104.575 250.025,104.575 ; 212.525,104.575 212.525,161.575 ; 212.525,104.575 212.525,161.575 ; 212.525,161.575 250.025,161.575 ; 250,238.5 250,295.5 ; 250,238.5 250,295.5 ; 250,238.5 250,295.5 ; 250.025,104.575 250.025,161.575 ; 250.025,104.575 250.025,161.575 ; 250.025,104.575 250.025,161.575
  lines w0.3: 110.221,74.546 110.221,289.92 ; 147.742,69.958 147.742,289.786 ; 185.085,67.29 185.085,290.038 ; 222.727,50.898 222.727,289.896
Mechanical 1:
  circle w0.013: c5.006,395.006 r1.5
  circle w0.013: c245.006,395.006 r1.5
  circle w0.013: c245.006,5.006 r1.5
  circle w0.013: c5.006,5.006 r1.5
  circle w0.013: c5.006,395.006 r1.5
  circle w0.013: c245.006,395.006 r1.5
  circle w0.013: c245.006,5.006 r1.5
  circle w0.013: c5.006,5.006 r1.5
  circle w0.013: c5.006,5.006 r1.5
  circle w0.013: c5.006,395.006 r1.5
  circle w0.013: c245.006,5.006 r1.5
  circle w0.013: c245.006,395.006 r1.5
  lines w0.013: 0.006,5.006 ccw(c5.006,5.006) 5.006,0.006 ; 0.006,5.006 ccw(c5.006,5.006) 5.006,0.006 ; 0.006,5.006 ccw(c5.006,5.006) 5.006,0.006 ; 0.006,5.006 0.006,395.006 ; 0.006,395.006 cw(c5.006,395.006) 5.006,400.006 ; 0.006,395.006 cw(c5.006,395.006) 5.006,400.006 ; 0.006,395.006 cw(c5.006,395.006) 5.006,400.006 ; 5.006,0.006 245.006,0.006 ; 5.006,400.006 245.006,400.006 ; 245.006,0.006 ccw(c245.006,5.006) 250.006,5.006 ; 245.006,0.006 ccw(c245.006,5.006) 250.006,5.006 ; 245.006,0.006 ccw(c245.006,5.006) 250.006,5.006 ; 245.006,400.006 cw(c245.006,395.006) 250.006,395.006 ; 245.006,400.006 cw(c245.006,395.006) 250.006,395.006 ; 245.006,400.006 cw(c245.006,395.006) 250.006,395.006 ; 250.006,5.006 250.006,161.506 100.006,161.506 100.006,238.506 250.006,238.506 250.006,395.006

## Dimensions
100.006,161.506 to 250.006,161.506 on Top Layer 1

## Text inside footprints (layer, text, board x,y; h text height)
C74: Top Overlay "-" at 19.558,159.294 h1.52 r90; Top Overlay "+" at 19.558,152.563 h1.52 r90
C81: Top Overlay "-" at 36.449,159.294 h1.52 r90; Top Overlay "+" at 36.449,152.563 h1.52 r90
U1: Bottom Overlay "*" at 226.893,313.709 h1.27 r90; Mechanical 13 "*" at 227.998,312.121 h1.27 r90
U3: Top Overlay "Vout" at 31.176,390.521 h0.6; Top Overlay "Vref" at 27.188,385.212 h0.6; Top Overlay "GND" at 27.442,387.778 h0.6; Top Overlay "VCC" at 31.811,385.162 h0.6
U4: Top Overlay "Vout" at 61.154,59.986 h0.6 r90; Top Overlay "Vref" at 66.463,55.998 h0.6 r90; Top Overlay "GND" at 63.897,56.252 h0.6 r90; Top Overlay "VCC" at 66.513,60.621 h0.6 r90
U5: Bottom Overlay "*" at 235.219,86.468 h1.27 r270; Mechanical 13 "*" at 234.115,88.055 h1.27 r270
U7: Bottom Overlay "*" at 189.251,313.851 h1.27 r90; Mechanical 13 "*" at 190.355,312.263 h1.27 r90
U10: Bottom Overlay "*" at 197.645,86.368 h1.27 r270; Mechanical 13 "*" at 196.54,87.955 h1.27 r270
U18: Bottom Overlay "*" at 151.907,313.598 h1.27 r90; Mechanical 13 "*" at 153.012,312.011 h1.27 r90
U20: Bottom Overlay "*" at 160.314,86.202 h1.27 r270; Mechanical 13 "*" at 159.209,87.79 h1.27 r270
U22: Bottom Overlay "*" at 114.387,313.732 h1.27 r90; Mechanical 13 "*" at 115.492,312.145 h1.27 r90
U25: Bottom Overlay "*" at 122.722,86.173 h1.27 r270; Mechanical 13 "*" at 121.617,87.761 h1.27 r270